# Altium PCB Inverter_540VDC_V2_TEST.PcbDoc
Units mm, origin at the board's own origin, x right, y up, seen from the top; angles counter-clockwise.
Board outline 100 x 100 mm, 2 copper layers (Top Layer, Bottom Layer), stack 2.071 mm thick; 124 components, 72 nets, 330 pads, 78 vias.
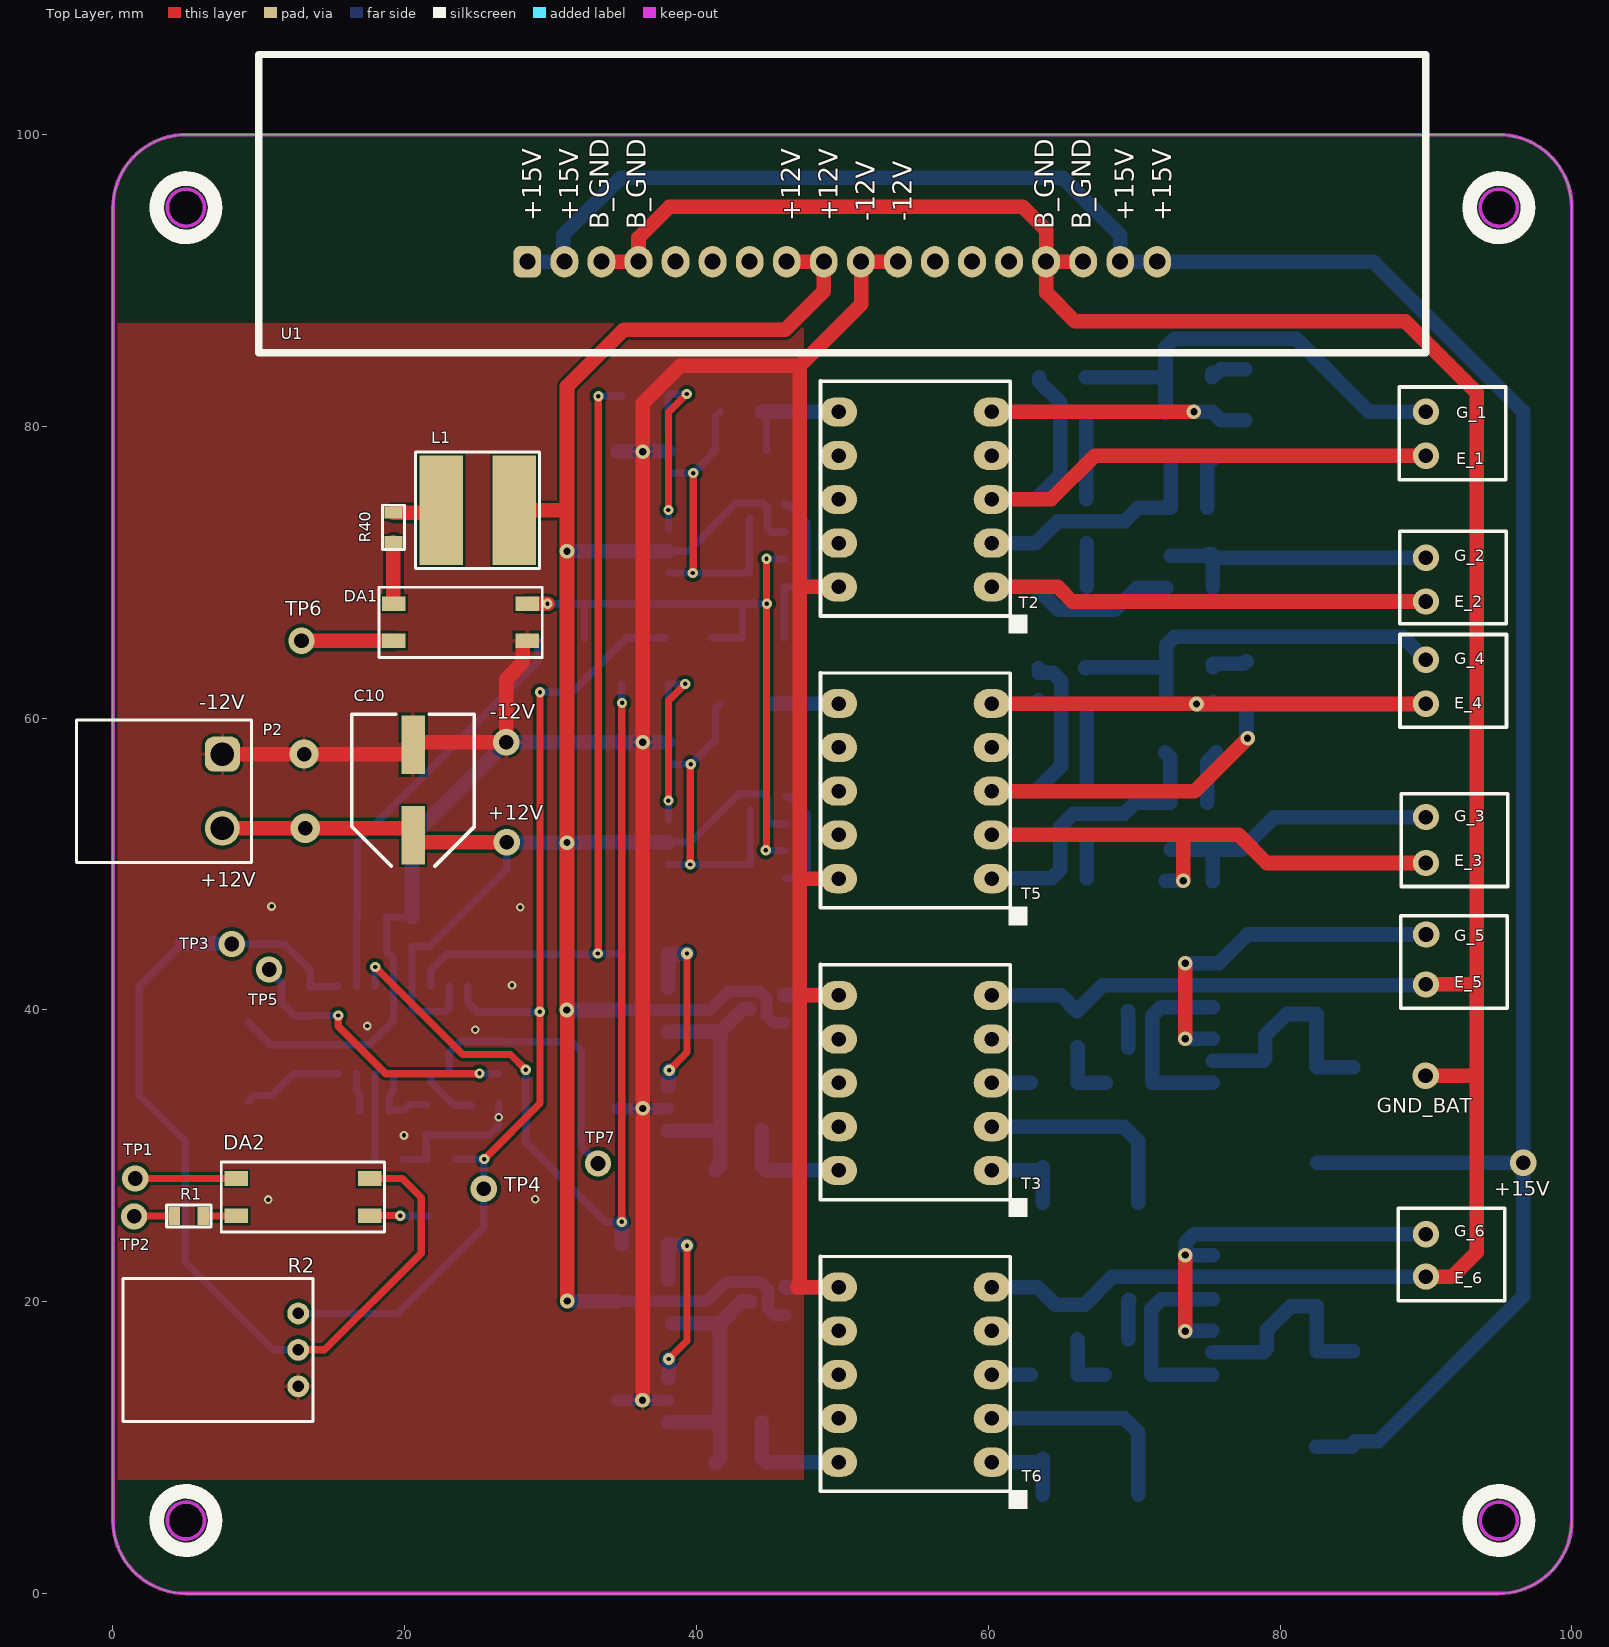
[diagram p0: Top Layer view]
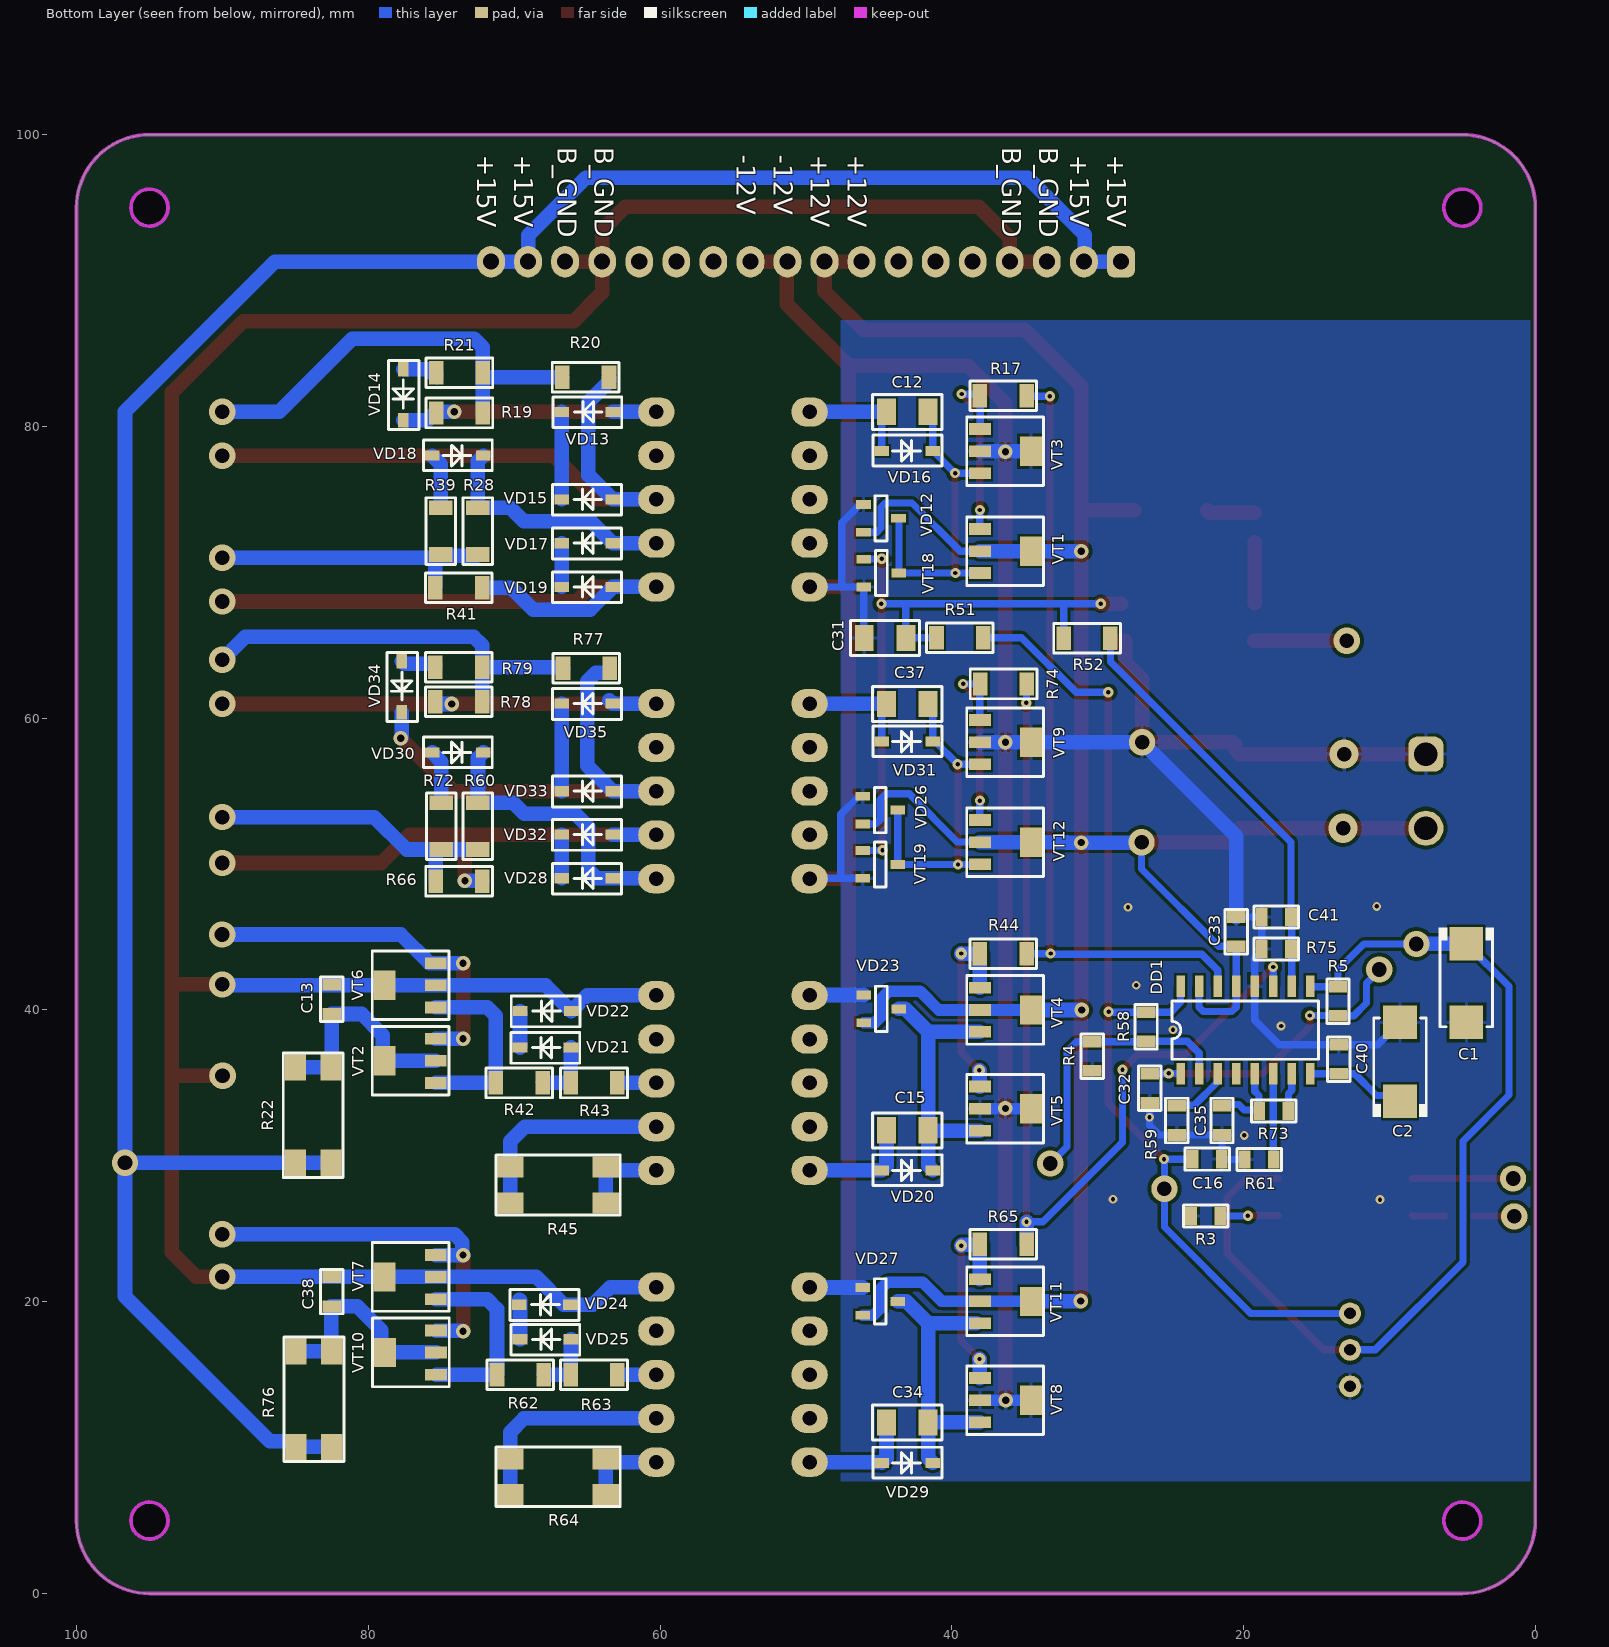
[diagram p1: Bottom Layer view, seen from below]
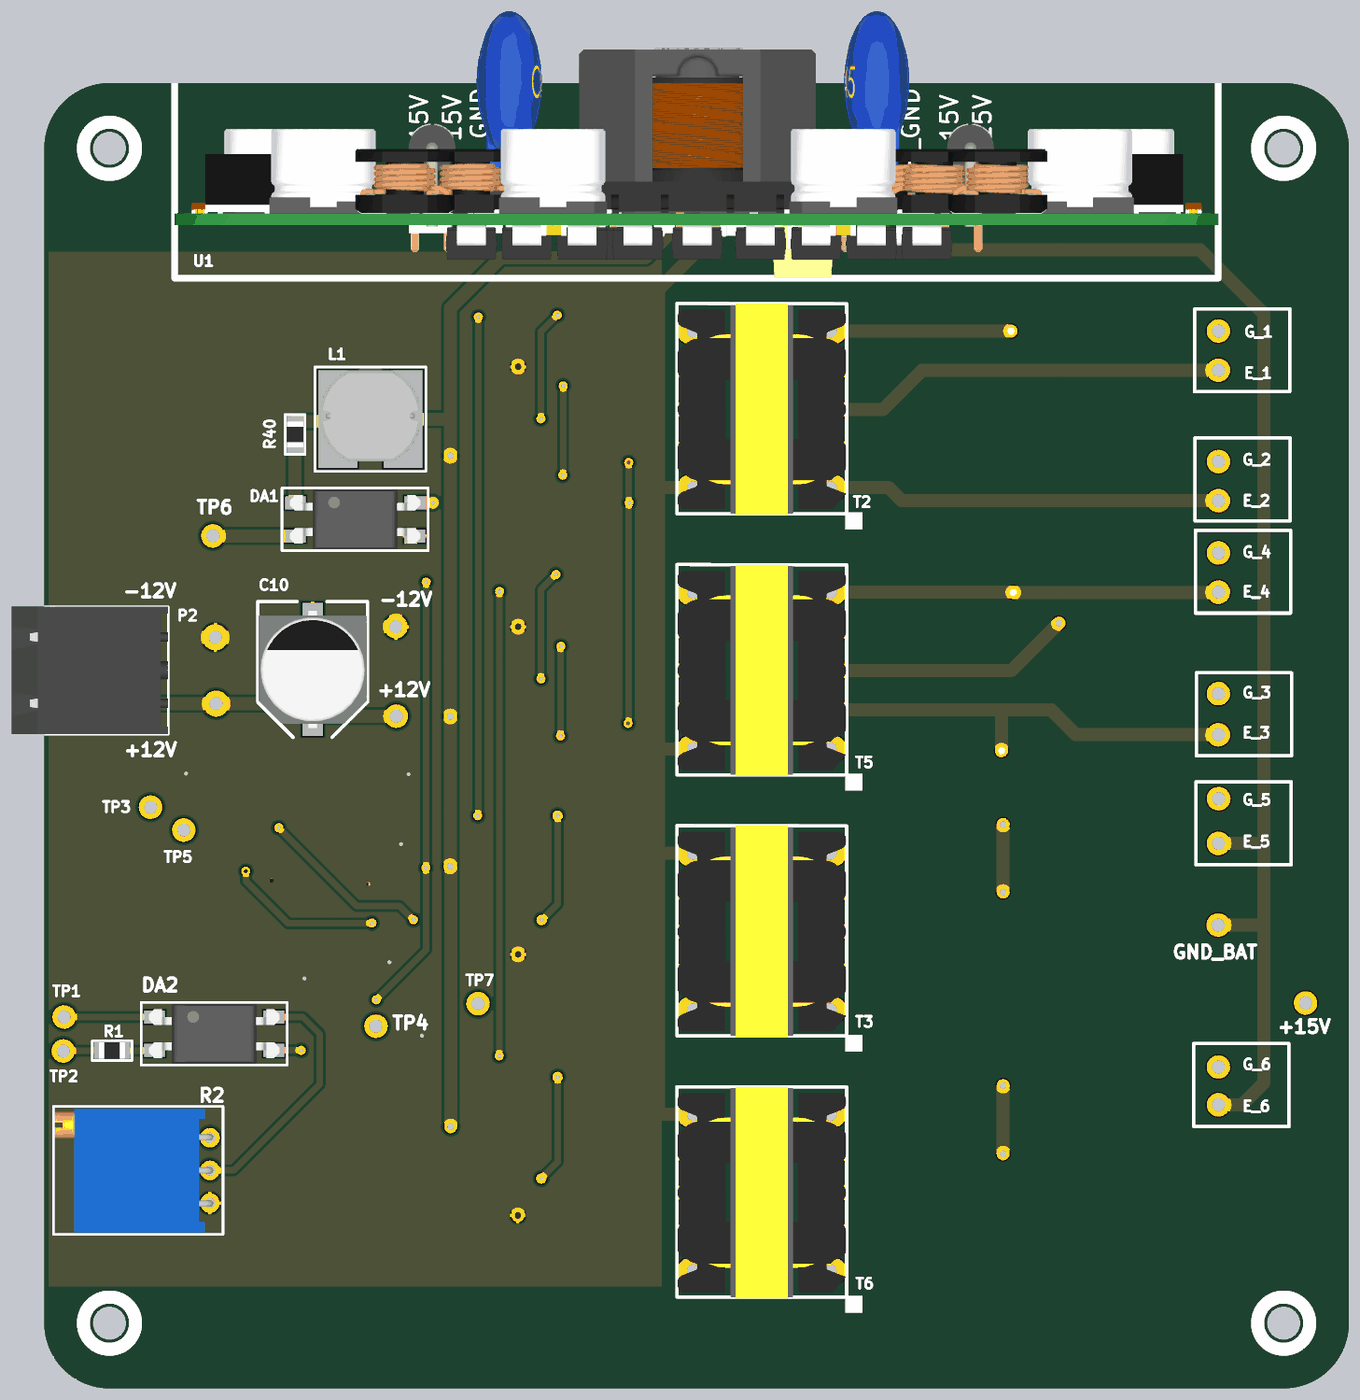
[diagram p2: 3D render of the assembled board from above, using the file's embedded part models]
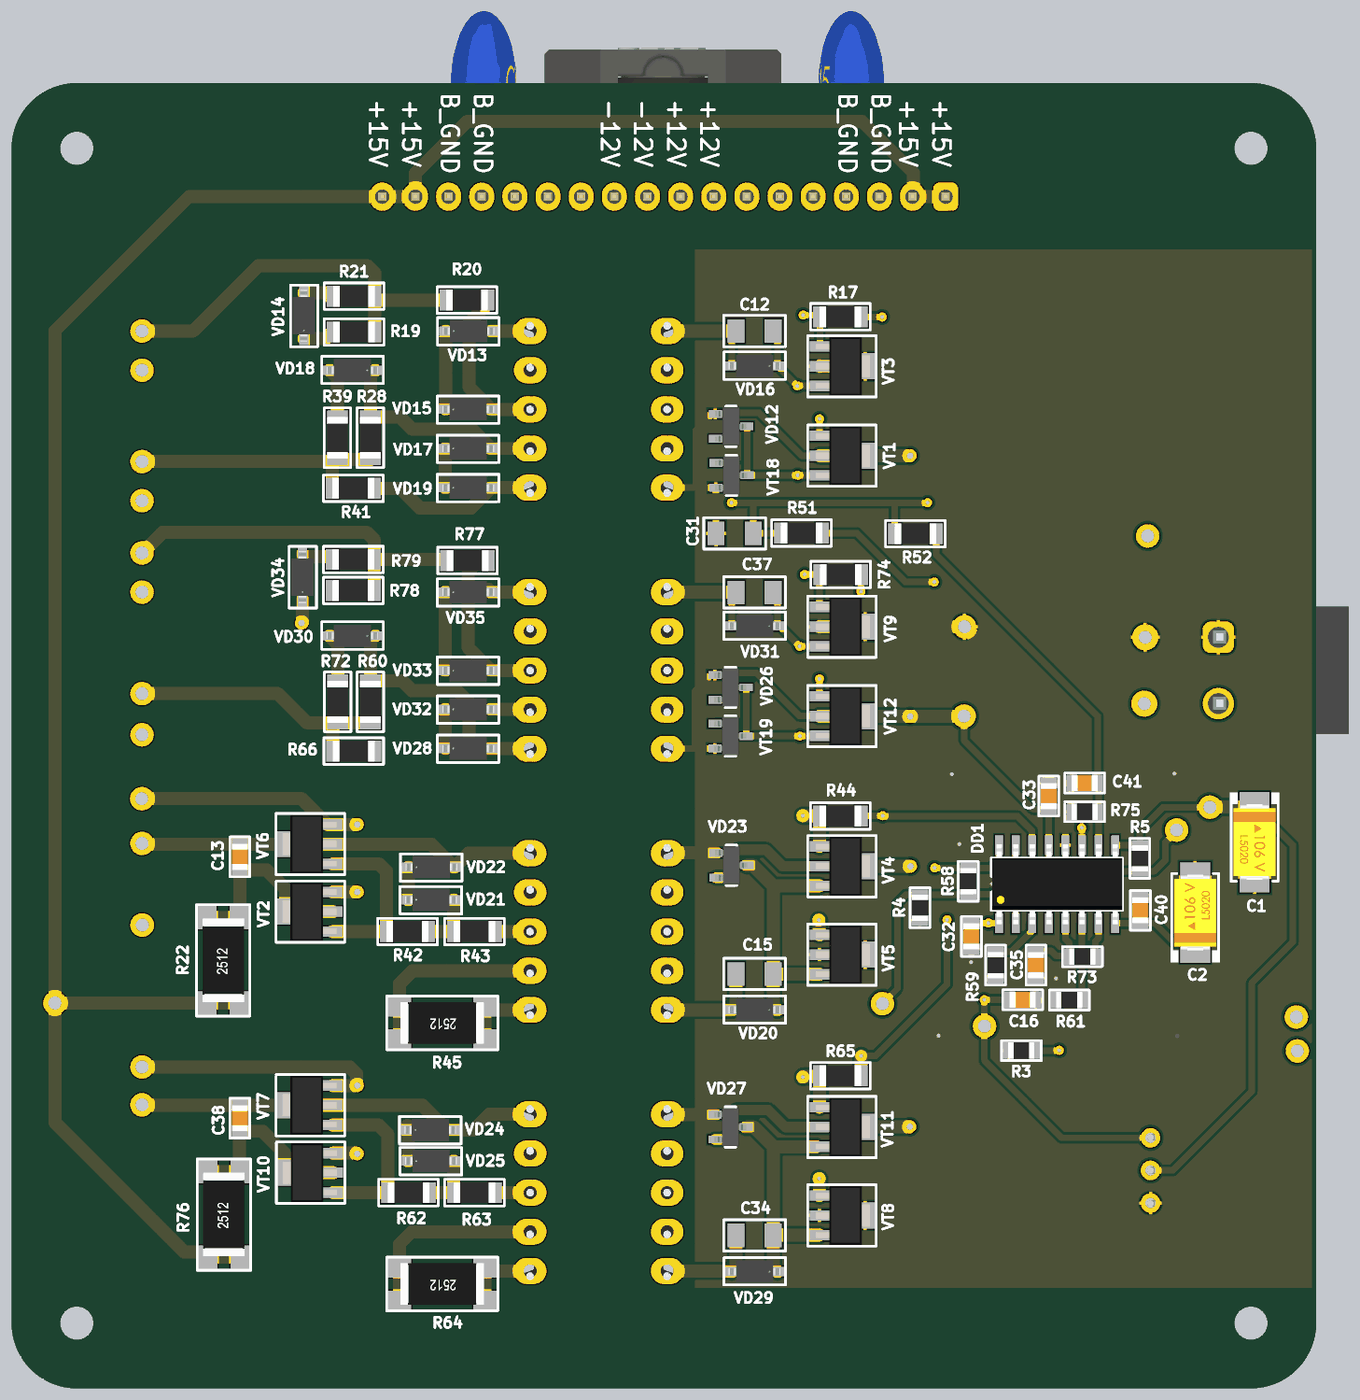
[diagram p3: 3D render of the assembled board from below, using the file's embedded part models]

## Layer stack, top to bottom
Top Solder: solder mask 0.0102, Solder Resist, Dk 3.5
Top Layer: signal copper 0.0356
Dielectric 1: dielectric 2, FR-4, Dk 4.8
Bottom Layer: signal copper 0.0356
Bottom Solder: solder mask 0.0102, Solder Resist, Dk 3.5

## Board outline
0,5.022 0,95 cw(c5,95) 5,100 95,100 cw(c95,95) 100,95 100,5 cw(c95,5) 95,0 5,0 cw(c5,5)
cut-out: 3.73,5 ccw(c5,5) 5,3.73 ccw(c5,5) 6.27,5 ccw(c5,5) 5,6.27 ccw(c5,5)
cut-out: 93.73,5 ccw(c95,5) 95,3.73 ccw(c95,5) 96.27,5 ccw(c95,5) 95,6.27 ccw(c95,5)
cut-out: 93.73,95 ccw(c95,95) 95,93.73 ccw(c95,95) 96.27,95 ccw(c95,95) 95,96.27 ccw(c95,95)
cut-out: 3.73,95 ccw(c5,95) 5,93.73 ccw(c5,95) 6.27,95 ccw(c5,95) 5,96.27 ccw(c5,95)

## Design rules (kind name [scope] priority, off if disabled: settings)
Clearance [All] p1: gap=0.254 ignorepadtopadclearanceinfootprint=TRUE except(0: THPad-Hole Via-Hole Fill-Hole Poly-Hole Region-Hole Text-Hole; 0.15: SMDPad-SMDPad SMDPad-THPad SMDPad-Via SMDPad-Fill SMDPad-Poly SMDPad-Region SMDPad-Text SMDPad-Hole; 0.2: Arc-Arc Arc-Track Arc-SMDPad Arc-THPad Arc-Via Arc-Fill Arc-Poly Arc-Region Arc-Text Arc-Hole Track-Track Track-SMDPad Track-THPad Track-Via Track-Fill Track-Poly Track-Region Track-Text Track-Hole Poly-Poly)
ComponentClearance [All] p1: gap=-5 collisioncheckmode=3 verticalgap=0.254 showdistances=FALSE
DiffPairsRouting [All] p1: maxlimit=5 minlimit=0.254 mostfreqgap=0.254 toplayer_minwidth=0.381 toplayer_maxwidth=0.381 toplayer_prefwidth=0.381 bottomlayer_minwidth=0.381 bottomlayer_maxwidth=0.381 bottomlayer_prefwidth=0.381 maxuncoupledlength=12.7
Height [All] p1: minheight=0 maxheight=150 prefheight=50
HoleToHoleClearance [All] p1: gap=0 allowstackedmicrovias=TRUE
MinimumSolderMaskSliver [All] p1: minsoldermaskwidth=0
PlaneClearance [All] p1: clearance=0.7
PlaneConnect [All] p1: planeconnectstyle=Relief reliefexpansion=0.5 reliefentries=4 reliefconductorwidth=0.254 reliefairgap=0.2
PolygonConnect [All] p1: connectstyle=Relief reliefconductorwidth=0.254 reliefentries=4 polygonreliefangle="90 Angle" airgapwidth=0.2
RoutingVias [All] p1: holewidth=0.711 width=1.27 viastyle="Through Hole" minholewidth=0.711 minwidth=1.27 maxholewidth=0.711 maxwidth=1.27
SilkToSilkClearance [All] p1: silktosilkclearance=0
SilkToSolderMaskClearance [IsPad] p1: minsilkscreentomaskgap=0 clearancetoexposedcopper=TRUE
SolderMaskExpansion [All] p1: expansion=0.102 istentingtop=FALSE
Width [All] p1: maxlimit=7 minlimit=0.254 preferedwidth=2 minimp=50.000000 maximp=50.000000 favimp=50.000000
21 further rules are at their usual default settings.

## Components (designator, comment, footprint, x,y, rotation, side; value= is the part's Value field where it differs from the comment)
+12V "Test_Point_PCB" Test_Point#1 26.989,51.5 r90 top
+15V "Test_Point_PCB" Test_Point#1 96.677,29.525 r90 top
-12V "Test_Point_PCB" Test_Point#1 26.956,58.35 r90 top
C1 "47uF" CAP-TAN-C 4.725,41.85 r270 bottom
C2 "47uF" CAP-TAN-C 9.275,36.45 r90 bottom
C10 "CAP-POLAR" CAPPOL_SMD_SIZE_E 20.575,55.075 r90 top
C12 "100nF" CAP-1206 43.05,81 r0 bottom
C13 "100nF" CAP-0805 82.5,40.725 r270 bottom locked
C15 "100nF" CAP-1206 43.05,31.75 r180 bottom locked
C16 "100nF" CAP-0805 22.5,29.775 r180 bottom
C31 "100nF" CAP-1206 44.575,65.5 r180 bottom
C32 "100nF" CAP-0805 26.425,34.625 r270 bottom
C33 "100nF" CAP-0805 20.5,45.375 r270 bottom
C34 "100nF" CAP-1206 43.05,11.725 r0 bottom locked
C35 "100nF" CAP-0805 21.475,32.425 r90 bottom
C37 "100nF" CAP-1206 43.05,60.975 r180 bottom
C38 "100nF" CAP-0805 82.5,20.7 r270 bottom locked
C40 "100nF" CAP-0805 13.475,36.625 r90 bottom
C41 "100nF" CAP-0805 17.75,46.375 r180 bottom
DA1 "PC817" 4-SMD 23.825,66.575 r0 top
DA2 "PC817" 4-SMD 13.025,27.175 r0 top
DD1 "SG3525" SO16-150 19.85,38.625 r90 bottom
E_1 "Test_Point_PCB" Test_Point#1 90,78 r90 top locked
E_2 "Test_Point_PCB" Test_Point#1 90,68 r90 top locked
E_3 "Test_Point_PCB" Test_Point#1 90,50.075 r90 top locked
E_4 "Test_Point_PCB" Test_Point#1 90,61 r90 top
E_5 "Test_Point_PCB" Test_Point#1 90,41.75 r0 top locked
E_6 "Test_Point_PCB" Test_Point#1 90,21.725 r0 top locked
G_1 "Test_Point_PCB" Test_Point#1 90,81 r0 top locked
G_2 "Test_Point_PCB" Test_Point#1 90,71 r90 top locked
G_3 "Test_Point_PCB" Test_Point#1 90,53.225 r90 top locked
G_4 "Test_Point_PCB" Test_Point#1 90,64 r90 top locked
G_5 "Test_Point_PCB" Test_Point#2 90.025,45.175 r90 top
G_6 "Test_Point_PCB" Test_Point#1 90,24.625 r90 top locked
GND_BAT "Test_Point_PCB" Test_Point#3 89.975,35.5 r90 top
L1 "IND-CONST" IND-7850 25,74.25 r0 top
P2 "691701530002B" 691701530002B 3.5,55 r270 top locked
R1 "1K" RES-0805 5.2,25.875 r0 top
R2 "3296W" 3296W 7,17 r0 top locked
R3 "10K" RES-0805 22.6,25.875 r180 bottom
R4 "10K" RES-0805 30.375,36.825 r270 bottom
R5 "100K" RES-0805 13.525,40.6 r270 bottom
R17 "10" RES-1206 36.475,82.1 r0 bottom
R19 "RES-CONST" RES-1206 73.75,80.925 r180 bottom
R20 "RES-CONST" RES-1206 65.1,83.375 r180 bottom
R21 "RES-CONST" RES-1206 73.75,83.675 r180 bottom locked
R22 "RES-CONST" RES-2512 83.775,32.8 r90 bottom locked
R28 "RES-CONST" RES-1206 72.5,72.825 r270 bottom locked
R39 "RES-CONST" RES-1206 75.025,72.825 r270 bottom locked
R40 "1K" RES-0805 19.225,73.075 r90 top
R41 "RES-CONST" RES-1206 73.8,68.95 r180 bottom
R42 "10" RES-1206 69.65,35 r0 bottom locked
R43 "100" RES-1206 64.525,35 r0 bottom locked
R44 "100" RES-1206 36.475,43.85 r0 bottom
R45 "RES-CONST" RES-2512 67,28 r0 bottom
R51 "1K" RES-1206 39.45,65.525 r0 bottom
R52 "10K" RES-1206 30.725,65.475 r0 bottom
R58 "10K" RES-0805 26.675,38.85 r270 bottom
R59 "1K" RES-0805 24.575,32.425 r270 bottom
R60 "RES-CONST" RES-1206 72.5,52.6 r270 bottom
R61 "4K2" RES-0805 18.925,29.75 r0 bottom
R62 "10" RES-1206 69.575,15 r0 bottom
R63 "100" RES-1206 64.525,15 r0 bottom
R64 "RES-CONST" RES-2512 67,8 r0 bottom locked
R65 "100" RES-1206 36.475,23.95 r0 bottom
R66 "RES-CONST" RES-1206 73.775,48.825 r180 bottom
R72 "RES-CONST" RES-1206 75,52.6 r270 bottom locked
R73 "100" RES-0805 17.925,33.075 r0 bottom
R74 "10" RES-1206 36.45,62.35 r0 bottom
R75 "4K7" RES-0805 17.75,44.175 r180 bottom
R76 "RES-CONST" RES-2512 83.725,13.325 r90 bottom locked
R77 "RES-CONST" RES-1206 65.05,63.425 r0 bottom
R78 "RES-CONST" RES-1206 73.8,61.125 r0 bottom
R79 "RES-CONST" RES-1206 73.8,63.5 r180 bottom
T2 "TRANS_EE16" TRANS_EE16 55,75 r180 top locked
T3 "TRANS_EE16" TRANS_EE16 55,35 r180 top locked
T5 "TRANS_EE16" TRANS_EE16 55,55 r180 top locked
T6 "TRANS_EE16" TRANS_EE16 55,15 r180 top locked
TP1 "Test_Point_PCB" Test_Point#1 1.525,28.45 r0 top
TP2 "Test_Point_PCB" Test_Point#1 1.45,25.85 r90 top
TP3 "Test_Point_PCB" Test_Point#1 8.15,44.525 r90 top
TP4 "Test_Point_PCB" Test_Point#1 25.425,27.75 r90 top
TP5 "Test_Point_PCB" Test_Point#1 10.7,42.775 r90 top
TP6 "Test_Point_PCB" Test_Point#4 12.921,65.305 r90 top
TP7 "Test_Point_PCB" Test_Point#1 33.25,29.475 r90 top
U1 "DC-DC" DC-DC_Bridge 90,90 r0 top locked
VD12 "BAT54S" SOT23-3 44.85,73.7 r180 bottom
VD13 "J3 16V" SOD-123 64.975,81 r180 bottom locked
VD14 "1N4148" SOD-123 77.6,82.175 r90 bottom
VD15 "J3 16V" SOD-123 65,75 r180 bottom locked
VD16 "1N4148" SOD-123 43.05,78.325 r0 bottom
VD17 "J3 16V" SOD-123 65,72 r180 bottom locked
VD18 "1N4148" SOD-123 73.875,78 r0 bottom locked
VD19 "J3 16V" SOD-123 65,69 r180 bottom locked
VD20 "1N4148" SOD-123 43.05,29 r0 bottom locked
VD21 "J3 16V" SOD-123 67.85,37.425 r180 bottom
VD22 "J3 16V" SOD-123 67.825,39.925 r180 bottom
VD23 "BAT54S" SOT23-3 44.825,40.075 r180 bottom locked
VD24 "J3 16V" SOD-123 67.9,19.8 r180 bottom
VD25 "J3 16V" SOD-123 67.85,17.425 r180 bottom
VD26 "BAT54S" SOT23-3 44.9,53.7 r180 bottom locked
VD27 "BAT54S" SOT23-3 44.9,20.025 r180 bottom locked
VD28 "J3 16V" SOD-123 65,49.025 r180 bottom locked
VD29 "1N4148" SOD-123 43.05,8.95 r0 bottom locked
VD30 "1N4148" SOD-123 73.875,57.65 r0 bottom
VD31 "1N4148" SOD-123 43.05,58.4 r0 bottom
VD32 "J3 16V" SOD-123 65,52.025 r180 bottom locked
VD33 "J3 16V" SOD-123 65,55 r180 bottom locked
VD34 "1N4148" SOD-123 77.7,62.15 r90 bottom
VD35 "J3 16V" SOD-123 65,61 r180 bottom locked
VT1 "2SC2655" SOT-89 36.075,71.45 r270 bottom
VT2 "2SC2655" SOT-89 77.375,36.525 r90 bottom locked
VT3 "2SA1020" SOT-89 36.075,78.3 r270 bottom locked
VT4 "2SC2655" SOT-89 36.075,40 r270 bottom locked
VT5 "2SA1020" SOT-89 36.075,33.225 r270 bottom locked
VT6 "2SA1020" SOT-89 77.375,41.7 r90 bottom locked
VT7 "2SA1020" SOT-89 77.375,21.7 r90 bottom
VT8 "2SA1020" SOT-89 36.075,13.25 r270 bottom locked
VT9 "2SA1020" SOT-89 36.075,58.35 r270 bottom locked
VT10 "2SC2655" SOT-89 77.35,16.525 r90 bottom
VT11 "2SC2655" SOT-89 36.075,20.025 r270 bottom locked
VT12 "2SC2655" SOT-89 36.075,51.5 r270 bottom locked
VT18 "AO3404" SOT23-3 44.825,69.95 r180 bottom
VT19 "AO3404" SOT23-3 44.9,49.975 r180 bottom locked

## Footprints (in the part's own frame and the unit in brackets; to place one, negate y for a bottom-side part, rotate by r counter-clockwise, add the part's x,y. Pads: shape width x height; smd on the part's side, far side on the other; paste and mask are expansions set on the pad)
4-SMD [mm]
  rect 1.6x1 smd: 1(-4.575,1.27) 2(-4.575,-1.27) 3(4.575,-1.27) 4(4.575,1.27)
  silkscreen extent -5.6,-2.4 5.6,2.4, body extent -5,-2.29 5,2.29, height 3.85
3296W [mm]
  round 1.5 hole 0.8: 1(5.7,-2.8) 2(5.7,-0.3) 3(5.7,2.2)
  silkscreen extent -6.3,-5.2 6.7,4.6, body extent -6.2,-5.05 5.95,4.45, height 4.8
691701530002B [mm] "THR - 5,08mm - PCB Horizontal Open - 02p"
  rrect50% 2.4x2.4 hole 1.6: 1(-2.54,4)
  round 2.4 hole 1.6: 2(2.54,4)
  silkscreen extent -4.88,-6 4.88,6, body extent -4.9,-6 4.86,6, height 8.6
CAP-0805 [mm]
  rect 0.8x1.25 smd mask+0.015: 1(-1,0) 2(1,0)
  silkscreen extent -1.52,-0.76 1.52,0.76, body extent -1,-0.62 1,0.63, height 0.8
CAP-1206 [mm]
  rect 1.3x1.8 smd: 1(-1.425,0) 2(1.425,0)
  silkscreen extent -2.37,-1.2 2.37,1.2, body extent -1.68,-0.87 1.67,0.87, height 0.95
CAP-TAN-C [mm]
  rect 2.3x2.3 smd: 1(-2.7,0) 2(2.7,0)
  silkscreen extent -3.8,-1.9 3,1.9, body extent -2.9,-1.6 2.9,1.6, height 2.6
CAPPOL_SMD_SIZE_E [mm]
  rect 4x1.6 smd: 1(-3.1,0) 2(3.1,0)
  silkscreen extent -5.2,-4.2 5.2,4.2, body extent -4.5,-4.15 4.5,4.15, height 6.2
DC-DC_Bridge [mm]
  rrect50% 1.905x2.159 hole 1.1: 1(-61.595,1.294)
  oval 1.905x2.159 hole 1.1: 2(-59.055,1.294) 3(-56.515,1.294) 4(-53.975,1.294) 5(-51.435,1.294) 6(-48.895,1.294) 7(-46.355,1.294) 8(-43.815,1.294) 9(-41.275,1.294) 10(-38.735,1.294) 11(-36.195,1.294) 12(-33.655,1.294) 13(-31.115,1.294) 14(-28.575,1.294) 15(-26.035,1.294) 16(-23.495,1.294) 17(-20.955,1.294) 18(-18.415,1.294)
  silkscreen extent -80.01,-4.95 -0.01,15.5, body extent -80,-4.89 0,15.5, height 84
IND-7850 [mm]
  rect 3x7.5 smd: 1(-2.5,0) 2(2.5,0)
  silkscreen extent -4.25,-4 4.25,4, body extent -3.81,-3.25 3.81,3.75, height 4.9
RES-0805 [mm]
  rect 0.8x1.25 smd mask+0.015: 1(-1,0) 2(1,0)
  silkscreen extent -1.52,-0.76 1.52,0.76, body extent -1,-0.62 1,0.63, height 0.6
RES-1206 [mm]
  rect 1x1.6 smd: 1(-1.6,0) 2(1.6,0)
  silkscreen extent -2.29,-1.02 2.29,1.02, body extent -1.6,-0.8 1.6,0.8, height 0.6
RES-2512 [mm]
  rect 1.8x1.45 smd: 1(-3.275,-1.225) 1(-3.275,1.225) 2(3.275,-1.225) 2(3.275,1.225)
  silkscreen extent -4.28,-2.05 4.25,2.05, body extent -3.2,-1.6 3.2,1.6, height 0.6
SO16-150 [mm]
  rect 1.5x0.6 smd: 1(-3,4.46) 2(-3,3.19) 3(-3,1.92) 4(-3,0.65) 5(-3,-0.62) 6(-3,-1.89) 7(-3,-3.16) 8(-3,-4.43) 9(3,-4.43) 10(3,-3.16) 11(3,-1.89) 12(3,-0.62) 13(3,0.65) 14(3,1.92) 15(3,3.19) 16(3,4.46)
  silkscreen extent -2,-5 2,5.06, body extent -3.07,-4.98 3.07,4.98, height 1.78
SOD-123 [mm]
  rect 1x0.7 smd: 1(-1.75,0) 2(1.75,0)
  silkscreen extent -2.37,-1.08 2.35,1.02, body extent -1.98,-0.85 1.98,0.85, height 1.45
SOT23-3 [mm]
  rect 1x0.6 smd: 1(-1.2,0.95) 2(-1.2,-0.95) 3(1.2,0)
  silkscreen extent -0.4,-1.55 0.4,1.55, body extent -1.25,-1.46 1.23,1.46, height 1.02
SOT-89 [mm]
  rect 0.8x1.5 smd: 1(-1.525,-2) 2(0,-2) 3(1.5,-2)
  rect 2x1.5 smd: 2(0,1.5)
  silkscreen extent -2.35,-2.9 2.35,2.35, body extent -2.25,-2.29 2.25,1.86, height 1.5
Test_Point#1 [mm]
  round 1.8 hole 1 paste-2539.97 mask+0.102: 1(0,0)
Test_Point#2 [mm]
  round 1.8 hole 1 paste-2539.97 mask+0.102: 1(0,0.025)
Test_Point#3 [mm]
  round 1.8 hole 1 paste-2539.97 mask+0.102: 1(0,-0.025)
Test_Point#4 [mm]
  round 1.8 hole 1 unplated paste-2539.97 mask+0.102: 1(0,0)
TRANS_EE16 [mm]
  oval 2.5x2 hole 1: 1(-5.25,6) 2(-5.25,3) 3(-5.25,0) 4(-5.25,-3) 5(-5.25,-6) 6(5.25,-6) 7(5.25,-3) 8(5.25,0) 9(5.25,3) 10(5.25,6)
  silkscreen extent -7.7,-8.11 6.5,9.2, body extent -6.47,-8.1 6.45,8.1, height 15.55

## Part data
+12V +15V -12V E_1 E_2 E_3 E_4 E_5 E_6 G_1 G_2 G_3 G_4 G_5 G_6 GND_BAT TP1 TP2 TP3 TP4 TP5 TP6 TP7: library part TP_PCB?, "Test_Point"
C1 C2: library part CAP-POLAR
C12 C13 C15 C16 C31 C32 C33 C34 C35 C37 C38 C40 C41: library part CAP-NON-POLAR
P2: "WR-TBL Series 7015B Open Horizontal PCB Header, SMT, pitch 5.08mm, 2p", Manufacturer="Wurth Elektronik", Operating Temperature Max=105°C, Operating Temperature Min=-40°C, Rated Current=10A, Working Voltage=300V, Application=Pluggable, Category="Terminal Blocks", ComponentLink1Description="Website Link", ComponentLink1URL=https://www.we-online.com/redexpert/article/691701530002B?ad, ComponentLink2Description="Datasheet Link", ComponentLink2URL=https://www.we-online.com/redexpert/spec/691701530002B?ad, Manufacturer Part Number=691701530002B, Match Code=WR-TBL, Modularity=No, Mount="Surface Mount", Number of Pins=2, Number of Rows=1, Orientation=Horizontal, Packaging=Box, Pitch=5.08mm
R1 R5: library part RES-CONST, "10K"
R3 R4 R17 R40 R42 R43 R44 R51 R52 R58 R59 R61 R62 R63 R65 R73 R74 R75: library part RES-CONST
U1: library part DC-DC/12-18VDC
VD12 VD23 VD26 VD27: library part DIODE-4
VD13 VD15 VD17 VD19 VD21 VD22 VD24 VD25 VD28 VD32 VD33 VD35: library part ZENER
VD14 VD16 VD18 VD20 VD29 VD30 VD31 VD34: library part DIODE
VT1 VT2 VT4 VT10 VT11 VT12: library part BIPOLAR-NPN-BEC
VT3 VT5 VT6 VT7 VT8 VT9: library part BIPOLAR-PNP-BCE
VT18 VT19: library part MOSFET-N-GDS

## Via types
v1: diameter 0.7, hole 0.3, Top Layer to Bottom Layer, 24 vias
v2: diameter 1.8, hole 1, Top Layer to Bottom Layer, 23 vias
v3: diameter 1, hole 0.5, Top Layer to Bottom Layer, 16 vias
v4: diameter 0.6, hole 0.3, Top Layer to Bottom Layer, tented both sides, 9 vias
v5: diameter 0.8, hole 0.3, Top Layer to Bottom Layer, 4 vias
v6: diameter 2, hole 1, Top Layer to Bottom Layer, 2 vias

## Nets (pads, with @x,y where several pads share a name; then routed paths per layer and width w, separated by ;. In a path a pad name is that pad's centre, name@x,y a point inside that pad or via, vN(x,y) a via of type N, cw(c..) or ccw(c..) an arc to the next point about the centre after c; other vN are vias at no path point)
+12V: +12V.1 C10.1 C33.2 DD1.13 DD1.15 L1.2 P2.2 U1.8 U1.9 VD12.2 VD23.2 VD26.2 VD27.2 VT1.2 VT4.2 VT11.2 VT12.2 | length 204.5
  Top Layer w1: P2.2 13.177,52.46 20.275,52.46 20.575,52.16 20.575,51.8 20.875,51.5 v2(26.989,51.5) ; L1.2 31.025,74.25 ; 31.125,82.75 v3(31.125,51.475) 31.125,40.025 v3(31.1,40) 31.15,39.95 v3(31.15,20.05) ; 31.196,82.821 35,86.625 46.075,86.625 48.725,89.275 U1.9 U1.8
  Bottom Layer w0.5: DD1.15 23.05,41.615 23.05,40.193 22.757,39.9 20.793,39.9 20.5,40.193 DD1.13 C33.2 21.7,44.375 26.989,49.664 v2(26.989,51.5) +12V.1@26.989,51.475 ; VT12.2@38.075,51.5 38.093,51.518 39.618,51.518 42.925,54.825 44.5,54.825 44.9,54.425 44.9,53.043 45.193,52.75 VD26.2 ; VT1.2@38.075,71.45 39.425,71.45 42.725,74.75 44.557,74.75 44.85,74.457 44.85,73.043 45.143,72.75 VD12.2
  Bottom Layer w0.8: VT11.2@34.575,20.025 38.075,20.025 40.7,20.025 42,21.325 44.431,21.325 44.9,20.856 44.9,19.544 45.369,19.075 VD27.2 ; VT4.2@34.575,40 38.075,40 40.9,40 42.175,41.275 44.331,41.275 44.8,40.806 44.8,39.594 45.269,39.125 VD23.2
  Bottom Layer w1: +12V.1@26.989,51.475 v3(31.125,51.475) 32.1,51.475 32.075,51.5 34.575,51.5 VT12.2@38.075,51.5 ; v3(31.1,40) VT4.2@34.575,40 ; v3(31.125,71.45) VT1.2@38.075,71.45 ; v3(31.15,20.05) 31.175,20.025 VT11.2@34.575,20.025
  other v6: 13.177,52.456
+15V: +15V.1 R22.1 R76.1 U1.1 U1.2 U1.17 U1.18 | length 172.7
  Bottom Layer w1: U1.1 U1.2 30.875,91.364 30.875,93.125 34.8,97.05 65.1,97.05 69.045,93.105 U1.17 U1.18 86.406,91.294 96.677,81.023 v2(96.677,29.525) ; R76.1@82.5,10.05 R76.1@84.95,10.05 ; R22.1@82.55,29.525 85,29.525 v2(96.677,29.525) ; R76.1@84.95,10.225 85.175,10.45 86.75,10.45 96.677,20.377 v2(96.677,29.525)
-12V: -12V.1 C1.2 C2.2 C10.2 C16.2 C31.1 C32.2 C33.1 C35.1 C40.2 C41.1 DA1.3 DD1.12 P2.1 R2.1 R3.1 R4.2 R59.2 R61.2 R75.1 T2.10 T3.6 T5.10 T6.6 U1.10 U1.11 VD12.1 VD23.1 VD26.1 VD27.1 VT3.2 VT5.2 VT8.2 VT9.2 VT18.2 VT19.2 | length 291
  Top Layer w1: P2.1 v6(13.104,57.54) 20.275,57.54 20.575,57.84 C10.2 20.75,58.35 v2(26.956,58.35) 26.956,62.681 28.1,63.825 28.1,65.305 DA1.3 ; v3(36.3,13.25) 36.325,13.275 v3(36.325,33.25) v3(36.325,58.35) v3(36.325,78.275) 36.325,81.6 38.875,84.15 47.075,84.15 ; 46.9,21 47.075,21 ; T6.6 47.075,21 ; T3.6 47.075,41 ; T5.10 49.746,48.996 47.075,48.996 ; T2.10 47.075,69 ; U1.11 U1.10 51.3,91.259 51.3,88.375 47.075,84.15 ; 47.075,21 47.075,41 ; 47.075,41 47.075,48.996 ; 47.075,48.996 47.075,69 ; 47.075,69 47.075,84.15
  Bottom Layer w0.5: C2.2 10.8,37.625 C40.2 17.55,37.625 19.23,39.305 DD1.12 19.23,43.507 18.937,43.8 18.9,43.8 18.75,43.95 R75.1 C41.1 C33.1 ; R61.2 21.475,29.75 C16.2 21.475,29.8 C35.1 ; C35.1@21.475,31.525 C35.1 ; C32.2 26.425,32.702 26.45,32.677 v4(26.45,32.65) 26.45,32.1 25.775,31.425 R59.2 C35.1 ; C31.1 46.025,65.525 VT18.2 47.452,69 ; VD12.1@46.043,74.657 VD12.1 46.1,74.6 46.35,74.6 47.55,73.4 47.55,69.098 47.452,69 ; VT19.2 47.611,49.025 ; VD26.1 46.15,54.6 46.425,54.6 47.611,53.414 47.611,49.025 ; T5.10 49.725,49.025 47.611,49.025 ; T2.10 47.452,69
  Bottom Layer w0.8: VT8.2@34.575,13.25 v3(36.3,13.25) VT8.2@38.075,13.25 ; VT5.2@34.575,33.225 36.3,33.225 v3(36.325,33.25) 36.35,33.225 VT5.2@38.075,33.225
  Bottom Layer w1: C33.1 20.5,51.893 v2(26.956,58.35) ; -12V.1@27.276,58.35 34.575,58.35 v3(36.325,58.35) VT9.2@38.075,58.35 ; VT3.2@34.575,78.3 VT3.2@38.075,78.3 ; VD23.1 49.725,41.025 T3.6 ; VD27.1 49.725,20.975 T6.6
  other v4: 10.65,27 28.95,27.025 19.95,31.4 24.838,38.645 17.425,38.9 27.35,41.7 27.925,47.05 10.875,47.1
BAT_GND: C13.1 C38.1 E_5.1 E_6.1 GND_BAT.1 T3.5 T6.5 U1.3 U1.4 U1.15 U1.16 VD22.2 VD24.2 VT6.2 VT7.2 | length 205.1
  Top Layer w1: U1.3 U1.4 36.025,92.925 38.15,95.05 62.375,95.05 63.965,93.46 U1.15 ; U1.16 U1.15 ; v2(90,21.725) 91.8,21.725 93.475,23.4 93.475,35.285 ; GND_BAT.1 93.26,35.5 93.475,35.285 ; v2(90,41.75) 93.237,41.75 93.475,41.512 ; U1.15 63.965,89.185 65.925,87.225 88.575,87.225 93.475,82.325 93.475,41.512 ; 93.475,35.285 93.475,41.512
  Bottom Layer w1: T6.5 63.4,21 64.6,19.8 VD24.2 66.6,19.8 68.5,21.7 75.375,21.7 78.875,21.7 C38.1 90,21.7 E_6.1@90.025,21.725 ; T3.5 65,41 VD22.2 67.85,41.7 75.375,41.7 78.875,41.7 89.95,41.7 v2(90,41.75)
  other v2: 89.975,35.5
NetC1_1: C1.1 DA2.4 DD1.9 R2.2 R5.1 TP3.1 | length 66.2
  Top Layer w0.5: R2.2 14.5,16.7 21.125,23.325 21.125,27.15 19.83,28.445 DA2.4
  Bottom Layer w0.5: C1.1 1.8,41.625 1.8,34.175 4.95,31.025 4.95,22.725 10.975,16.7 R2.2 ; v2(8.15,44.525) 11.75,44.525 13.525,42.75 R5.1 15.395,41.6 DD1.9
  Bottom Layer w1: C1.1 8.125,44.55 v2(8.15,44.525)
NetC2_1: C2.1 C40.1 DD1.8 | length 6.9
  Bottom Layer w0.5: C2.1 9.657,34.132 10.882,34.132 12.375,35.625 DD1.8
NetC12_1: C12.1 VD12.3 VD16.1 VT1.3 VT3.3 VT18.3 | length 22.9
  Top Layer w0.5: v1(39.75,69.95) 39.775,69.975 v1(39.775,76.8)
  Bottom Layer w0.5: VT1.3 VT18.3 43.625,73.675 VD12.3 ; VT3.3 v1(39.775,76.8) 41.05,78.075 41.05,78.225 41.15,78.325 VD16.1 41.3,80.675 C12.1
NetC12_2: C12.2 T2.6 VD16.2 | length 8.1
  Bottom Layer w0.5: C12.2 44.8,80.675 VD16.2
  Bottom Layer w1: C12.2 T2.6
NetC13_2: C13.2 R22.2 VT2.2 | length 15.5
  Bottom Layer w1: VT2.2@75.375,36.525 78.875,36.525 78.998,36.648 78.998,38.273 80.45,39.725 C13.2 82.5,36.125 82.55,36.075 R22.2@85,36.075
NetC15_1: C15.1 T3.10 VD20.2 | length 7.8
  Bottom Layer w1: C15.1 44.475,29.325 VD20.2 T3.10
NetC15_2: C15.2 VD20.1 VD23.3 VT4.3 VT5.3 | length 19.4
  Bottom Layer w1: VT5.3 41.6,31.725 C15.2 ; VT4.3 41.625,38.5 ; VD20.1 41.625,29.325 C15.2 ; VD23.3 43.2,40.075 41.625,38.5 ; C15.2 41.625,38.5
NetC16_1: C16.1 DD1.16 R2.3 R51.1 R58.1 TP4.1 | length 71.8
  Top Layer w0.5: v1(25.45,29.775) 29.275,33.6 29.275,39.85 v1(29.25,39.875) 29.275,39.9 v1(29.275,61.775)
  Bottom Layer w0.5: R2.3 19.5,19.2 25.425,25.125 v2(25.425,27.75) 25.425,29.75 v1(25.45,29.775) C16.1 ; DD1.16 24.323,41.612 24.323,40.527 25,39.85 29.225,39.85 v1(29.25,39.875) ; v1(29.275,61.775) 31.475,61.775 35.225,65.525 R51.1
NetC31_2: C31.2 DA1.4 R51.2 R52.2 VT18.1 VT19.1 | length 45.9
  Top Layer w0.5: v1(44.75,50.95) 44.788,50.988 44.788,51.13 44.8,51.141 44.8,67.85 v1(44.8,70.925)
  Top Layer w1: DA1.4 29.785,67.845 v1(29.79,67.85)
  Bottom Layer w0.5: v1(29.79,67.85) 32.325,67.85 ; R52.2 32.325,67.85 ; R51.2 43.125,65.525 C31.2 43.15,67.818 43.182,67.85 ; v1(44.75,50.95) 44.762,50.938 46.087,50.938 VT19.1 ; v1(44.8,70.925) 44.812,70.912 46.013,70.912 VT18.1 ; v1(44.825,67.85) 43.182,67.85 ; 32.325,67.85 43.182,67.85
NetC32_1: C32.1 DD1.1 R5.2 TP5.1 | length 20.8
  Top Layer w0.5: v1(15.45,39.625) 15.45,38.875 18.7,35.625 25.1,35.625 v1(25.125,35.65)
  Bottom Layer w0.5: v2(10.7,42.775) 10.7,42.707 11.575,41.832 11.575,40.475 12.445,39.605 13.519,39.605 R5.2 13.55,39.625 v1(15.45,39.625) ; DD1.1 24.335,35.65 v1(25.125,35.65) 25.15,35.625 C32.1
NetC34_1: C34.1 VD27.3 VD29.1 VT8.3 VT11.3 | length 19.3
  Bottom Layer w1: VT8.3 41.6,11.75 C34.1 41.625,9.275 VD29.1 ; VT11.3@38.325,18.518 41.614,18.518 ; C34.1@41.614,11.736 41.614,18.518 ; VD27.3 43.121,20.025 41.614,18.518
NetC34_2: C34.2 T6.10 VD29.2 | length 7.9
  Bottom Layer w1: C34.2 44.475,9.275 VD29.2 44.85,9 T6.10
NetC35_2: C35.2 DD1.5 R73.2 | length 5.4
  Bottom Layer w0.5: DD1.5 19.23,34.43 18.943,34.143 18.943,33.093 19,33.15 19.95,33.15 20.325,33.525 C35.2@21.475,33.525
NetC37_1: C37.1 T5.6 VD31.2 | length 7.4
  Bottom Layer w0.5: VD31.2 44.8,60.675 45.125,61
  Bottom Layer w1: 45.125,61 T5.6
NetC37_2: C37.2 VD26.3 VD31.1 VT9.3 VT12.3 VT19.3 | length 22.8
  Top Layer w0.5: v1(39.575,49.975) 39.575,56.825 v1(39.6,56.85)
  Bottom Layer w0.5: VT12.3 38.1,49.975 v1(39.575,49.975) VT19.3 VD26.3 ; VT9.3 v1(39.6,56.85) 41.15,58.4 VD31.1 41.3,60.65 C37.2
NetC38_2: C38.2 R76.2 VT10.2 | length 14.8
  Bottom Layer w1: VT10.2@75.35,16.525 78.85,16.525 79.1,16.775 79.1,18.05 80.75,19.7 C38.2 82.525,19.675 82.525,16.6 R76.2@85.007,16.6
NetC41_2: C41.2 DD1.10 R52.1 R75.2 | length 29
  Bottom Layer w0.5: DD1.10 16.69,44.175 16.69,46.315 C41.2 16.75,51.5 29.125,63.875 R52.1
NetDA1_1: DA1.1 R40.1 | length 4.2
  Top Layer w0.5: DA1.1@19.225,67.87 DA1.1
  Top Layer w1: DA1.1@19.225,67.87 R40.1
NetDA1_2: DA1.2 TP6.1 | length 6.3
  Top Layer w1: v2(12.921,65.305) DA1.2
NetDA2_1: DA2.1 TP1.1 | length 6.9
  Top Layer w0.5: v2(1.525,28.45) 8.445,28.45 DA2.1
NetDA2_2: DA2.2 R1.2 | length 2.3
  Top Layer w0.5: R1.2 8.42,25.875 DA2.2
NetDA2_3: DA2.3 R3.2 | length 4
  Top Layer w0.5: DA2.3 19.695,25.905 v1(19.7,25.9)
  Bottom Layer w0.5: v1(19.7,25.9) 19.725,25.875 R3.2
NetDD1_2: DD1.2 R4.1 R58.2 TP7.1 | length 19.3
  Bottom Layer w0.5: DD1.2 23.04,37.04 23.85,37.85 R58.2 26.7,37.825 R4.1 30.38,37.82 31.455,37.82 32.1,37.175 32.1,30.625 v2(33.25,29.475)
NetDD1_3: DD1.3 R59.1 | length 4
  Bottom Layer w0.5: DD1.3 21.82,35.575 21.82,35.03 23.382,33.468 24.532,33.468 R59.1
NetDD1_6: DD1.6 R61.1 | length 5.9
  Bottom Layer w0.5: R61.1 17.96,29.785 DD1.6
NetDD1_7: DD1.7 R73.1 | length 2.6
  Bottom Layer w0.5: DD1.7 16.69,34.485 16.925,34.25 R73.1
NetDD1_11: DD1.11 R65.1 R74.1 | length 66.8
  Top Layer w0.5: v1(17.975,42.95) 23.975,36.95 27.25,36.95 v1(28.3,35.9) ; v1(34.875,25.475) 34.875,61.025 v1(34.9,61.05)
  Bottom Layer w0.5: DD1.11 17.96,42.935 v1(17.975,42.95) ; v1(28.3,35.9) 28.3,30.925 33.75,25.475 v1(34.875,25.475) ; R74.1 34.875,62.325 34.875,61.075 v1(34.9,61.05)
  Bottom Layer w1: R65.1 v1(34.875,25.475)
NetDD1_14: DD1.14 R17.1 R44.1 | length 54.5
  Top Layer w0.5: v1(33.225,43.875) 33.273,43.923 v1(33.273,82.077)
  Bottom Layer w0.5: DD1.14 21.778,41.633 21.778,42.728 22.875,43.825 33.034,43.825 33.045,43.837 33.187,43.837 v1(33.225,43.875) 33.25,43.85 R44.1 ; v1(33.273,82.077) 34.852,82.077 R17.1
NetE_1_1: E_1.1 R20.2 T2.3 VD15.2 | length 43.7
  Top Layer w1: T2.3 64.3,75 67.3,78 v2(90,78)
  Bottom Layer w1: T2.3 VD15.2 64.925,76.675 64.925,81.65 63.5,83.075 R20.2
NetE_2_1: E_2.1 R41.2 T2.1 VD19.2 | length 43.4
  Top Layer w1: T2.1 64.75,69 65.75,68 v2(90,68)
  Bottom Layer w1: T2.1 VD19.2 63.25,68.975 64.8,67.425 68.675,67.425 70.2,68.95 R41.2
NetE_3_1: E_3.1 R66.2 T5.2 VD32.2 | length 38
  Top Layer w1: T5.2 73.525,52 ; v3(73.375,48.85) 73.375,51.85 73.525,52 ; v2(90,50.075) 79.1,50.075 77.175,52 73.525,52
  Bottom Layer w1: T5.2 60.275,52.025 VD32.2 ; R66.2 72.175,48.85 v3(73.375,48.85)
NetE_4_1: E_4.1 R78.2 T5.5 VD35.2 | length 33.7
  Top Layer w1: T5.5 74.25,61 v3(74.275,60.975) E_4.1@89.284,60.975 ; E_4.1@90,60.975 E_4.1@90.022,60.953
  Bottom Layer w1: T5.5 VD35.2 VD35.2@63.475,61.225 ; v3(74.275,60.975) 75.4,60.975 R78.2
  other v2: 90,61
NetG_1_1: G_1.1 R19.2 R20.1 R21.2 | length 30.1
  Bottom Layer w1: R20.1 R21.2@72.15,83.375 ; R19.2 72.15,83.075 R21.2@72.15,83.375 ; v2(90,81) 86.1,81 81.1,86 72.736,86 72.15,85.414 72.15,84.268 R21.2@72.15,83.375
NetG_2_1: G_2.1 R28.2 R39.2 R41.1 | length 20.2
  Bottom Layer w1: R28.2@72.525,71.15 75.375,71.15 75.375,70.85 75.4,70.825 R41.1 ; R39.2 R39.2@75.25,71 ; R39.2@75.25,71.225 75.325,71.225 75.55,71 v2(90,71)
NetG_3_1: G_3.1 R60.2 R66.1 R72.2 | length 20.2
  Bottom Layer w1: R60.2 74.7,51 R72.2 75.375,51 77.375,51 79.6,53.225 v2(90,53.225) ; R66.1 R72.2@75.375,50.625
NetG_4_1: G_4.1 R77.2 R78.1 R79.2 | length 27.9
  Bottom Layer w1: R77.2 66.65,63.5 R79.2 72.2,64.989 72.786,65.575 88.425,65.575 v2(90,64) ; R78.1 R79.2@72.2,63.2
NetG_5_1: G_5.1 VT2.3 VT6.3 | length 24.2
  Top Layer w1: v3(73.5,38.025) v3(73.5,43.2)
  Bottom Layer w1: v3@73.55,38.025 VT2.3 ; v3@73.575,43.2 VT6.3 75.8,43.2 77.775,45.175 G_5.1
  other v2: 90.025,45.175
NetG_6_1: G_6.1 VT7.3 VT10.3 | length 26.6
  Top Layer w1: v3(73.5,17.975) v3(73.5,23.2)
  Bottom Layer w1: v3(73.5,17.975) 73.55,18.025 VT10.3 ; VT7.3 v3(73.5,23.2) 73.552,23.252 73.552,24.091 74.086,24.625 v2(90,24.625)
NetL1_1: L1.1 R40.2 | length 3.3
  Top Layer w1: R40.2 22.325,74.075 L1.1
NetR1_1: R1.1 TP2.1 | length 2.8
  Top Layer w0.5: v2(1.45,25.85) 1.475,25.875 R1.1
NetR17_2: R17.2 VT1.1 VT3.1 | length 13.3
  Top Layer w0.5: v1(38.075,74.275) 38.075,80.975 v1(39.325,82.225)
  Bottom Layer w0.5: VT3.1@38.05,79.825 R17.2@38.05,82.075 ; VT1.1 v1(38.075,74.275) ; R17.2 38.174,82.199 39.299,82.199 v1(39.325,82.225)
NetR19_1: R19.1 T2.5 VD13.2 VD14.1 | length 20.6
  Top Layer w1: T2.5 v3(74.1,81)
  Bottom Layer w1: T2.5 VD13.2 ; v3(74.1,81) 74.102,80.998 75.362,80.998 75.936,80.425 VD14.1
NetR21_1: R21.1 VD14.2 | length 2.7
  Bottom Layer w1: R21.1@75.35,83.375 R21.1 75.686,83.675 75.936,83.925 VD14.2
NetR28_1: R28.1 T2.2 VD17.2 VD18.1 | length 17
  Bottom Layer w1: T2.2 VD17.2 64.75,73.5 69.339,73.5 70.264,74.425 R28.1 72.5,77.625 VD18.1
NetR39_1: R39.1 VD18.2 | length 3.8
  Bottom Layer w1: R39.1 75.025,77.4 VD18.2
NetR42_1: R42.1 R43.2 VD21.2 | length 4.4
  Bottom Layer w1: VD21.2 66.125,37.4 R43.2 R42.1
NetR42_2: R42.2 VT2.1 VT6.1 | length 13.1
  Bottom Layer w1: VT2.1 R42.2 71.25,39.589 71.836,40.175 VT6.1
NetR43_1: R43.1 T3.3 | length 2.7
  Bottom Layer w1: T3.3 R43.1
NetR44_2: R44.2 VT4.1 VT5.1 | length 13.3
  Top Layer w0.5: v5(38.125,35.875) 39.35,37.1 v5(39.35,43.875)
  Bottom Layer w1: VT5.1 38.1,34.775 38.1,35.85 v5(38.125,35.875) ; VT4.1 R44.2 38.075,43.863 39.338,43.863 v5(39.35,43.875)
NetR45_1: R45.1 T3.1 | length 6
  Bottom Layer w1: T3.1 63.5,29 63.725,29.225 R45.1@63.725,26.775
NetR45_2: R45.2 T3.2 | length 14.7
  Bottom Layer w1: T3.2 69.275,32 70.275,31 70.275,29.225 R45.2@70.275,26.775
NetR60_1: R60.1 T5.1 VD28.2 VD30.1 | length 19.7
  Bottom Layer w1: T5.1 60.275,49.025 64.339,49.025 64.925,49.611 64.925,52.55 65.825,53.45 69.314,53.45 70.064,54.2 72.475,54.2 72.475,57.3 VD30.1
NetR62_1: R62.1 R63.2 VD25.2 | length 4.3
  Bottom Layer w1: VD25.2 66.125,17.4 R63.2 R62.1
NetR62_2: R62.2 VT7.1 VT10.1 | length 13.2
  Bottom Layer w1: VT10.1 R62.2 71.175,19.5 71.85,20.175 VT7.1
NetR63_1: R63.1 T6.3 | length 2.7
  Bottom Layer w1: T6.3 R63.1
NetR64_1: R64.1 T6.1 | length 6
  Bottom Layer w1: T6.1 63.5,9 63.725,9.225 R64.1@63.725,6.775
NetR64_2: R64.2 T6.2 | length 14.7
  Bottom Layer w1: T6.2 69.325,12 70.275,11.05 70.275,9.225 R64.2@70.275,6.775
NetR65_2: R65.2 VT8.1 VT11.1 | length 13.3
  Top Layer w0.5: v5(38.1,16.075) 39.35,17.325 v5(39.35,23.85)
  Bottom Layer w1: VT8.1 38.088,14.787 38.088,16.063 v5(38.1,16.075) ; VT11.1 R65.2@38.075,23.9 ; R65.2 R65.2@38.075,23.9 ; v5(39.35,23.85) 39.3,23.9 R65.2@38.075,23.9
NetR72_1: R72.1 VD30.2 | length 3.7
  Bottom Layer w1: R72.1 75,57.025 VD30.2
NetR74_2: R74.2 VT9.1 VT12.1 | length 13.5
  Top Layer w0.5: v1(38.075,54.35) 38.075,61.2 v1(39.225,62.35)
  Bottom Layer w0.5: VT12.1 v1(38.075,54.35) ; VT9.1 38.075,62.325 R74.2 v1(39.225,62.35)
NetR77_1: R77.1 T5.3 VD33.2 VD34.1 | length 34.2
  Top Layer w1: T5.3 74.15,55 v3(77.775,58.625)
  Bottom Layer w1: T5.3 VD33.2 65,56.75 65,62.539 64.414,63.125 63.45,63.125 R77.1 ; VD34.1 77.7,58.7 v3(77.775,58.625)
NetR79_1: R79.1 VD34.2 | length 2.6
  Bottom Layer w1: R79.1 75.4,63.725 77.525,63.725 VD34.2
NetVD13_1: VD13.1 VD15.1 | length 6
  Bottom Layer w1: VD15.1@66.725,75.025 VD13.1
NetVD17_1: VD17.1 VD19.1 | length 3
  Bottom Layer w1: VD19.1 VD17.1
NetVD21_1: VD21.1 VD22.1 | length 2.5
  Bottom Layer w1: VD22.1 69.6,39.9 VD21.1
NetVD24_1: VD24.1 VD25.1 | length 2.7
  Bottom Layer w1: VD25.1 69.6,20.1 69.65,20.15
NetVD28_1: VD28.1 VD32.1 | length 3
  Bottom Layer w1: VD28.1 VD32.1
NetVD33_1: VD33.1 VD35.1 | length 6
  Bottom Layer w1: VD33.1 VD35.1
pads on no net: DD1.4 T2.4 T2.7 T2.8 T2.9 T3.4 T3.7 T3.8 T3.9 T5.4 T5.7 T5.8 T5.9 T6.4 T6.7 T6.8 T6.9 U1.5 U1.6 U1.7 U1.12 U1.13 U1.14

## Polygon pours and split planes (outlines as drawn)
-12V on Bottom Layer "NONET_L-01_P-001" (solid, remove dead copper, pour order 4): 0,87.275 47.611,87.275 47.611,7.7 0,7.7
-12V on Top Layer "NONET_L-01_P-001" (solid, pour order 5): 0,87.075 0,7.8 47.35,7.8 47.35,87.075

## Keep-outs
Keep-Out Layer:
  circle w0.254: c95,95 r1.27
  circle w0.254: c5,95 r1.27
  circle w0.254: c95,5 r1.27
  circle w0.254: c5,5 r1.27
  lines w0.254: 0,5 ccw(c5,5) 5,0 ; 0,5.022 0,95.025 ; 0,95 cw(c5,95) 5,100 95,100 cw(c95,95) 100,95 100,5 cw(c95,5) 95,0 ; 5.002,0 94.978,0

## Silkscreen, mask and mechanical layers (free items; w line width, h text height)
Top Overlay:
  circle w1: c95,95 r2
  circle w1: c95,5 r2
  circle w1: c5,5 r2
  circle w1: c5,95 r2
  lines w0.254: 88.104,20.066 88.104,26.416 95.404,26.416 95.404,20.066 88.104,20.066 ; 88.175,76.35 95.475,76.35 95.475,82.7 88.175,82.7 88.175,76.35 ; 88.204,66.466 88.204,72.816 95.504,72.816 95.504,66.466 88.204,66.466 ; 88.229,59.391 88.229,65.741 95.529,65.741 95.529,59.391 88.229,59.391 ; 88.279,40.116 88.279,46.466 95.579,46.466 95.579,40.116 88.279,40.116 ; 88.304,48.466 88.304,54.816 95.604,54.816 95.604,48.466 88.304,48.466
  text "-12V" at 5.929,60.629 h1
  text "+12V" at 5.979,48.454 h1

## Text inside footprints (layer, text, board x,y; h text height)
U1: Top Overlay "+15V" at 29.35,94.051 h1.3 r90; Top Overlay "+15V" at 31.89,94.051 h1.3 r90; Top Overlay "+15V" at 69.988,94.051 h1.3 r90; Top Overlay "+15V" at 72.528,94.051 h1.3 r90; Top Overlay "+12V" at 49.669,94.051 h1.3 r90; Top Overlay "-12V" at 52.208,94.051 h1.3 r90; Top Overlay "-12V" at 54.748,94.051 h1.3 r90; Top Overlay "+12V" at 47.129,94.051 h1.3 r90; Top Overlay "B_GND" at 64.475,93.533 h1.3 r90; Top Overlay "B_GND" at 67.015,93.534 h1.3 r90; Top Overlay "B_GND" at 33.997,93.534 h1.3 r90; Top Overlay "B_GND" at 36.537,93.534 h1.3 r90; Bottom Overlay "+15V" at 29.35,98.625 h1.3 r90; Bottom Overlay "+15V" at 31.89,98.625 h1.3 r90; Bottom Overlay "B_GND" at 33.997,99.142 h1.3 r90; Bottom Overlay "B_GND" at 36.537,99.142 h1.3 r90; Bottom Overlay "+12V" at 47.129,98.625 h1.3 r90; Bottom Overlay "+12V" at 49.669,98.625 h1.3 r90; Bottom Overlay "-12V" at 52.208,98.625 h1.3 r90; Bottom Overlay "-12V" at 54.748,98.625 h1.3 r90; Bottom Overlay "B_GND" at 64.475,99.142 h1.3 r90; Bottom Overlay "B_GND" at 67.015,99.142 h1.3 r90; Bottom Overlay "+15V" at 69.988,98.625 h1.3 r90; Bottom Overlay "+15V" at 72.528,98.625 h1.3 r90